# Altium PCB FogCalBoard.PcbDoc (part 2 of 2)
Units mil, origin at the board's own origin, x right, y up, seen from the top; angles counter-clockwise.
Board outline 2750 x 2750 mil, 4 copper layers (Top Layer, Middle 1 Layer, Middle 2 Layer, Bottom Layer), stack 53.912 mil thick; 111 components, 90 nets, 358 pads, 105 vias.
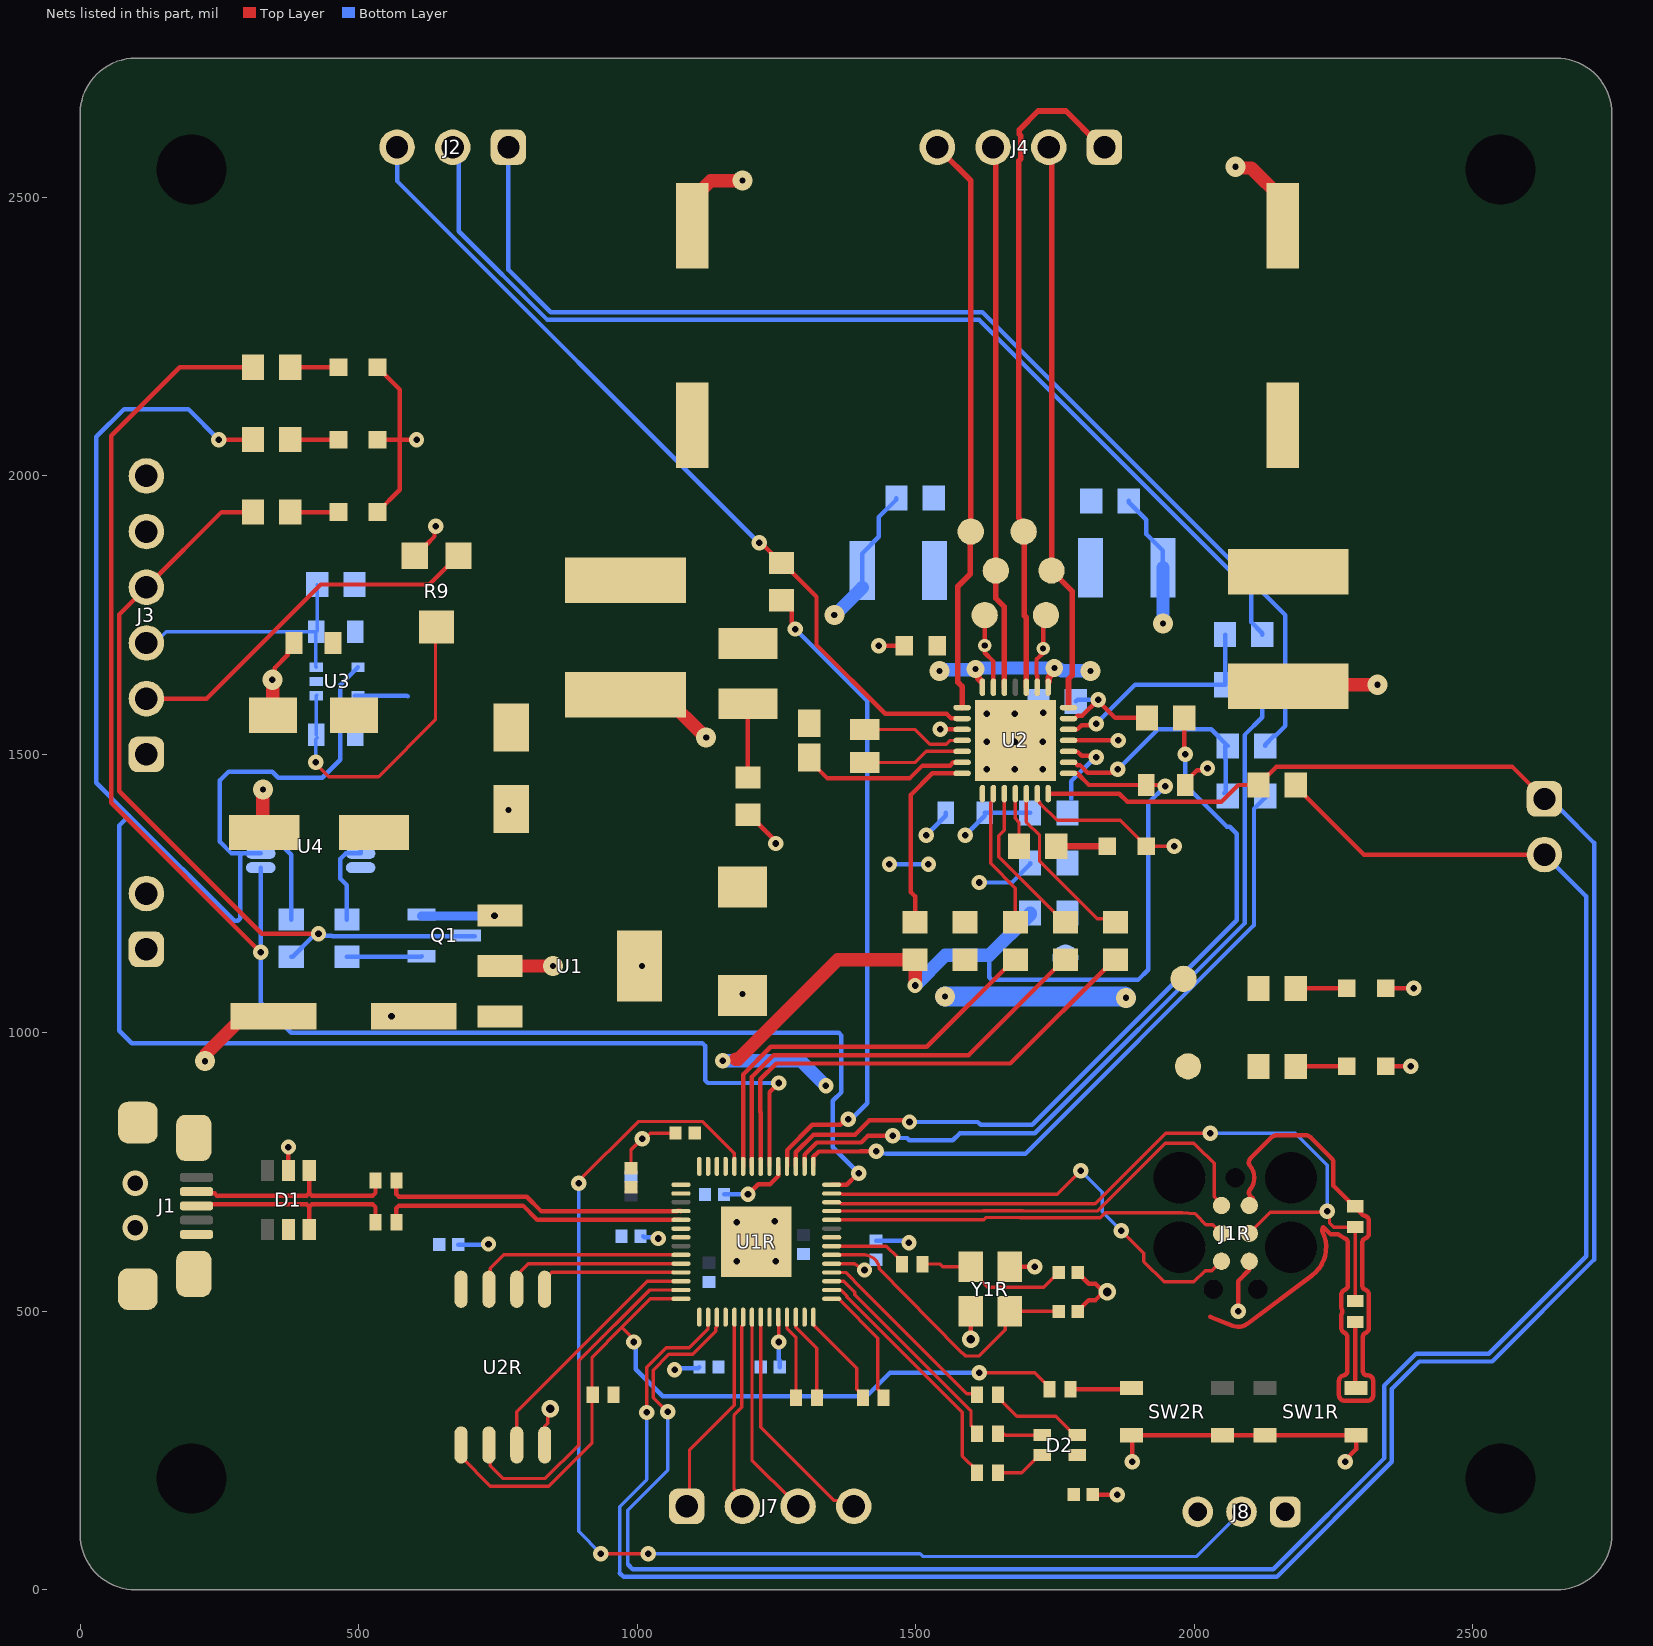
[diagram p4: the nets of this part, all layers, seen from the top]

## Via types
v1: diameter 27.56, hole 11.81, Top Layer to Bottom Layer, tented both sides, 79 vias
v2: diameter 36, hole 11, Top Layer to Bottom Layer, tented both sides, 17 vias
v3: diameter 31.5, hole 15.75, Top Layer to Bottom Layer, tented both sides, 3 vias
v4: diameter 32, hole 11, Top Layer to Bottom Layer, tented both sides, 2 vias
v5: diameter 45.28, hole 27.56, Top Layer to Bottom Layer, tented both sides, 2 vias
v6: diameter 24, hole 11, Top Layer to Bottom Layer, tented both sides, 2 vias

## Nets (pads, with @x,y where several pads share a name; then routed paths per layer and width w, separated by ;. In a path a pad name is that pad's centre, name@x,y a point inside that pad or via, vN(x,y) a via of type N, cw(c..) or ccw(c..) an arc to the next point about the centre after c; other vN are vias at no path point) (continued)
3V3: C1.1 C3R.1 C4R.1 C5.1 C5R.1 C6R.1 C7R.1 C8R.1 C9R.1 C10R.1 C14.1 D1.5 D2.4 J1R.2 J3.2 J8.1 R4R.1 R5R.1 R6.1 R9.1 R11.1 SB3.2 TP5.TP U1.3 U1R.1 U1R.10 U1R.22 U1R.33 U1R.42 U1R.43 U1R.44 U1R.48 U1R.49 U2.15 U2R.8 U3.5 U4.8 | length 4433.4
  Top Layer w6: v1(1254,445) U1R.10@1254,485
  Top Layer w8: J3.2@119,1600 227.02,1600 432.02,1805 627,1805 659.24,1837.24 659.75,1837.24 674.48,1851.98 R9.1@674.48,1852.48 ; v1(1199,710) 1217.41,728.41 1238.7,728.41 1253.37,743.09 U1R.33@1253.37,760.33 ; U2.15@1774.47,1465.94 1790.22,1465.94 1811.17,1445 C14.1@1914,1445 v1@1949,1445 ; 2029,490 2068.73,474.19 ccw(c2079,500) 2095.63,477.75 2211.72,564.54 ccw(c2174,615) 2230.7,642.47 cw(c2237.91,645.93) 2231.94,651.25 2244.89,638.3 2258.59,638.3 2260.5,637.13 2272.16,630.02 cw(c2268,623.19) 2276,623.19 2276,546.37 cw(c2268,546.41) 2270.81,538.92 ccw(c2274.24,529.53) 2264.24,529.53 2264.24,507.87 ccw(c2274.24,507.87) 2265.25,503.49 cw(c2258.05,500) 2265.25,496.51 ccw(c2274.24,492.13) 2264.24,492.13 2264.24,470.47 ccw(c2274.24,470.47) 2270.23,461.31 cw(c2267,453.99) 2275,454.03 2275,392.82 cw(c2267,392.86) 2268.38,384.98 ccw(c2270.02,375.12) 2260.02,375.12 2260.02,349.53 ccw(c2270.02,349.53) 2270.02,339.53 2311.36,339.53 ccw(c2311.36,349.53) 2321.36,349.53 2321.36,375.12 ccw(c2311.36,375.12) 2311.36,385.12 2311,385.12 cw(c2311,393.12) 2303,393.12 2303,454.03 cw(c2311,453.99) 2307.77,461.31 ccw(c2303.76,470.47) 2313.76,470.47 2313.76,529.53 ccw(c2303.76,529.53) 2307.19,538.92 cw(c2310,546.41) 2302,546.37 2302,623.63 cw(c2310,623.59) 2307.2,631.08 ccw(c2303.76,640.47) 2313.76,640.47 2313.76,662.13 ccw(c2303.76,662.13) 2303.76,672.13 2250,725.89 2250,766.1 ccw(c2237,766.1) 2246.23,775.25 2209.25,812.23 ccw(c2200.1,803) 2200.1,816 2147.9,816 ccw(c2147.9,803) 2138.71,812.19 2101.83,775.31 ccw(c2111,766.1) 2098.24,768.58 ccw(c2106.1,767.09) 2099.95,761.97 cw(c2074,740) 2100.22,718.36 ccw(c2106.42,713.3) 2099.07,710.16 ccw(c2111,715.32) 2101.79,706.14 2104.26,703.67 cw(c2098.63,697.99) 2105.76,694.37 J1R.2@2099,690
  Top Layer w24: 1176.5,952.5 1181.5,952.5 1360.5,1131.5 SB3.2@1499,1131.5 v1(1499,1085)
  Bottom Layer w8: J3.2@109,1590 J3.2@119,1590 ; J3.2@119,1595 J3.2@124,1600 ; U3.5@492.8,1605.41 586.59,1605.41 588,1604 ; C3R.1@679,620 v1@734,620 ; C5R.1@1011.13,634.96 1013.15,632.93 1036.1,632.93 v1(1038.16,630.87) ; v1(1067.22,395) 1069.72,397.5 1109.37,397.5 C6R.1@1111.87,400 ; C9R.1@1156.13,710 v1(1199,710) ; v1(1254,445) 1254,413.94 1256.13,411.81 C7R.1@1256.13,400 ; C8R.1@1429,627.13 1478.58,627.13 1482.71,623 v1(1488,623) ; 1632.09,1139.09 1632.09,1099.69 1636.78,1095 1899.2,1095 1917.66,1113.45 1917.66,1412.66 v1(1948,1443)
  Bottom Layer w24: v1(1154,950) 1294,950 v1(1339,905) ; v1(1499,1085) 1553.09,1139.09 1632.09,1139.09 1705.5,1212.5 R6.1@1705.5,1215
  other v1: 733.16,620.87 559,1030
+12: C2.2 C3.1 C4.2 C6.1 C7.1 C8.2 C9.1 C10.1 C11.1 CR1.1 CR2.1 J3.1 J5.1 Q1.2 R10.1 SB4.2 TP6.TP U1.1 U2.22 U2.28 | length 807.9
  Top Layer w12: v4(1607.63,1653.54) 1612.22,1648.95 1612.22,1636.86 U2.28@1618.87,1630.22 ; U2.22@1739.13,1630.22 1739.13,1638.64 1749,1648.51 v4(1749,1655)
  Top Layer w36: J5.1@119,1150 J5.1@132.89,1136.11
  Bottom Layer w16: Q1.2@613,1210 v1(744,1210)
  Bottom Layer w24: v2(1542.63,1650) 1544.4,1651.77 1605.86,1651.77 v4(1607.63,1653.54) ; v4@1609.32,1651.85 1612.47,1655 v4(1749,1655) 1751.3,1652.7 1759.14,1652.7 1761.84,1650 v2(1814,1650)
  Bottom Layer w36: v2(1552.61,1065.21) 1875.4,1065.21 v2(1877.61,1063)
DBG_TX_RP2040: J1R.5 U1R.27 | length 845.7
  Top Layer w6: U1R.27@1349.33,711.61 1366.56,711.61 1368.17,710 1754,710 1796.26,752.26 v1(1796.26,752.74) ; v1(1869,645) 1909.56,604.44 1909.56,589.44 1946,553 1999.68,553 2019.68,573 2032,573 J1R.5@2049,590
  Bottom Layer w6: v1(1796.26,752.74) 1835.04,713.96 1835.04,678.96 v1(1869,645)
EXT_DIR: J2.2 SB15.2 | length 1940.4
  Bottom Layer w8: J2.2@650.34,2588.66 655.25,2588.66 679.67,2564.23 679.67,2439.33 839,2280 1614.14,2280 2102.5,1791.64 2102.5,1737.5 2122.5,1717.5 SB15.2@2122.5,1715
EXT_STEP: J2.1 SB13.2 | length 2123.4
  Bottom Layer w8: J2.1@769,2590 769,2370 845,2294 1619.94,2294 2164,1749.94 2164,1551.5 2146,1533.5 2143.5,1533.5 2127.5,1517.5 SB13.2@2127.5,1515
GND: C1.2 C1R.2 C2.1 C2R.2 C3.2 C3R.2 C4R.2 C5.2 C5R.2 C6.2 C6R.2 C7.2 C7R.2 C8R.2 C9.2 C9R.2 C10.2 C10R.2 C11.2 C11R.2 C12R.2 C13.2 C13R.2 C14.2 C15.2 C16.2 CR1.2 CR2.2 CR3.2 D1.2 D3.2 D4.2 D5.2 D6.2 D7.2 D8.2 J1.5 J1.6 J1.7 J1.8 J1.9 J1R.6 J3.5 J3.6 J5.2 J8.3 R4.1 R8.1 R9.3 R16.2 R18.2 R19.2 R20.2 SB6.2 SB7.2 SW1R.B1 SW1R.B2 SW2R.B1 SW2R.B2 U1.2 U1.4 U1R.19 U1R.57 U2.3 U2.13 U2.18 U2.29 U2R.4 U3.2 U4.4 Y1R.2 Y1R.4 | length 4097.2
  Top Layer w6: U2R.4@834,260.24 834,293.7 839.5,299.2 839.5,320.5 v3(844,325) ; C4R.2@989,757.13 989,790 v1(1009,810) 1013.47,810 1023.47,820 C10R.2@1069,820 ; U1R.19@1349.33,585.63 1389.8,585.63 v1(1408.22,574.22) ; U2.13@1718.37,1429.53 1718.37,1418.7 1723.13,1413.94 1723.13,1412.52 1753.89,1381.76 1867.24,1381.76 D8.2@1914,1335 v1(1964,1335)
  Top Layer w8: C1.2@293.5,1030 C1.2@347,1030 ; v2@349.71,1636 349.71,1655.71 373,1679 373,1684 C2.1@394,1705 ; D1.2@374,753.15 v1(374,795) ; D7.2@534,1935 574,1975 574,2065 ; D6.2@534,2065 574,2065 ; D5.2@534,2195 574,2155 574,2065 ; v1(604,2065) 574,2065 ; R9.3@609,1864 609,1865.24 620.25,1876.49 621.49,1876.49 636.2,1891.2 636.2,1906.94 v1(638.56,1909.3) ; R4.1@1199,1391.5 1201.5,1391.5 1248,1345 v1@1249,1345 ; v1(1434,1695) C9.2@1479.47,1695 ; v1(1544,1545) 1544.16,1544.84 1583.37,1544.84 U2.3@1583.53,1544.68 ; v3(1599,450) Y1R.4@1599,500 ; Y1R.2@1669,580 v1(1714,580) ; U2.18@1774.47,1525 v1(1864,1525) ; C1R.2@1791.13,500 1791.13,500.79 1810.63,520.3 1822.94,520.3 v3@1837.64,535 ; C2R.2@1791.13,570 1791.13,569.21 1810.63,549.7 1822.94,549.7 v3@1837.64,535 ; C5.2@1818.13,171 1861,171 v1@1862,172 ; v3(1844,535) v3@1837.64,535 ; SW2R.B1@1887.31,277.68 1889,275.98 v1(1889,230) 1889,277.68 2116.68,277.68 ccw(c2116.68,280) SW1R.B1@2119,280 ; C14.2@1984,1445 1984,1450 2005.26,1471.26 2020.26,1471.26 v1(2024,1475) ; v1(2079,500) 2079,554.5 2099,574.5 J1R.6@2099,590 ; SW1R.B1@2127.31,277.68 SW1R.B2@2290.69,277.68 2290.69,252.64 2271.22,233.17 v1(2271.22,230) ; D4.2@2344,940 v1(2389,940) ; D3.2@2344,1080 v1(2394,1080)
  Top Layer w24: v2(224,949.17) 226.3,951.46 226.3,962.8 C1.2@293.5,1030 ; v2(328,1437) 328,1362.57 C3.2@330.57,1360 ; CR1.2@346,1570 v2@346,1627 ; U1.2@761.69,1120 v2(849,1120) ; C11.2@979,1607.24 1046.34,1607.24 1123.58,1530 v2(1124,1530) ; U1.4@1004,1120 v2(1009,1120) ; C7.2@1099,2449 1099,2496.5 1132.5,2530 v2(1189,2530) ; v2(2074,2555) 2076.3,2552.7 2102.8,2552.7 2159,2496.5 C6.2@2159,2449 ; C10.2@2169,1622.24 2171.76,1625 v2(2329,1625)
  Bottom Layer w8: v2(1354,1750) v2@1354.51,1750 ; R19.2@1404,1799.49 R19.2@1404,1830 1404,1860.51 1434,1890.51 1434,1926 1465.5,1957.5 SB7.2@1465.5,1960 ; v1(1519,1355) 1554,1390 C13.2@1554,1395 ; v1(1614,1270) 1673,1270 1705.5,1302.5 R8.1@1705.5,1305 ; SB6.2@1882.5,1955 1882.5,1952.5 1914,1921 1914,1895.51 1944,1865.51 R18.2@1944,1835
  Bottom Layer w24: v2@1354.51,1750 R19.2@1404,1799.49 ; v2@1944,1745 R18.2@1944,1835
  other v1: 1862,171 1179,590 1249,590 1179,660 1246.86,662.14 1249,1340 1628,1473 1678,1473 1728,1473 1628,1523 1678,1523 1728,1523 1628,1573 1678,1573 1729,1575
  other v2: 1189,1070 769,1400 345,1634 1944,1735
  other v5: 99,650 99,730
HEAT_OUT: J3.4 Q1.3 R14.1 SB2.1 | length 1440.1
  Top Layer w8: J3.4@119,1800 70.11,1751.11 70.11,1433.89 326,1178 v1(428,1178) ; J3.4@121.5,1802.5 254,1935 R14.1@310.5,1935
  Bottom Layer w8: SB2.1@379,1136.5 381.5,1136.5 419.11,1174.11 427.39,1174.11 428,1173.5 428.76,1174.26 451.6,1174.26 452.36,1173.5 Q1.3@708.54,1173.5
LEDB: R3.1 U1R.18 | length 352.4
  Top Layer w6: U1R.18@1349.33,569.88 1374.69,569.88 1404.56,540.01 1404.56,539.44 1592.16,351.84 1608.46,351.84 R3.1@1610.3,350
LEDG: R2.1 U1R.17 | length 394.7
  Top Layer w6: U1R.17@1349.33,554.13 1349.4,554.07 1370.7,554.07 1390.56,534.21 1390.56,530.01 1599.47,321.09 1599.47,294.76 1610.3,283.94 R2.1@1610.3,280
LEDR: R1.1 U1R.16 | length 446.6
  Top Layer w6: U1R.16@1349.33,538.39 1349.4,538.32 1366.65,538.32 1376.56,528.41 1376.56,526.31 1584,318.87 1584,240.24 1610.3,213.94 R1.1@1610.3,210
MC5V: C13.1 CR3.1 R7.1 SB4.1 U2.8 | length 206.2
  Bottom Layer w6: C13.1@1624,1390 C13.1@1624,1395
  Bottom Layer w8: v1@1454,1300 1457,1303 v1(1523,1303) ; v1(1589,1355) C13.1@1624,1390 ; C13.1@1624,1395 R7.1@1705.5,1395
  other v1: 1453,1303
MC_DIAG: R15.1 U2.11 | length 97.2
  Top Layer w6: U2.11@1679,1429.53 1679,1385 1685.5,1378.5 R15.1@1685.5,1335
MC_ENN: J2.3 SB1.2 U2.2 | length 1521.5
  Top Layer w8: v1@1224,1878.5 1240.5,1862 1240.5,1859.5 1256.5,1843.5 1261.5,1843.5 1322,1783 1322,1696.37 1445.59,1572.78 1555.51,1572.78 1563.56,1564.72 1583.18,1564.72 U2.2@1583.53,1564.37
  Bottom Layer w8: J2.3@569,2590 569,2529.36 1218.36,1880 v1(1219,1880)
MC_IDX: SB11.2 U1R.35 | length 870.1
  Top Layer w8: U1R.35@1221.87,773.56 1221.87,857.06 1221.22,857.71 1221.22,916.51 1249.71,945 1670,945 1856.5,1131.5 SB11.2@1859,1131.5
MC_MS1: SB9.2 U1R.37 | length 739
  Top Layer w8: U1R.37@1190.38,760.33 1190.38,773.5 1190.44,773.56 1190.44,925.33 1240.12,975 1520,975 1676.5,1131.5 SB9.2@1679,1131.5
MC_MS2: SB10.2 U1R.36 | length 810.9
  Top Layer w8: U1R.36@1206.13,760.33 1206.13,921.21 1244.91,960 1595,960 1766.5,1131.5 SB10.2@1769,1131.5
MC_STDBY: SB5.1 U1R.31 | length 1400.5
  Top Layer w8: U1R.31@1284.87,760.33 1284.87,785.46 1316.62,817.22 1391.22,817.22 1416.78,842.78 1486.22,842.78 v1(1489,840) ; SB5.1@1982.5,1565 1982.5,1501.5 v1(1984,1500)
  Bottom Layer w8: v1(1489,840) 1611.75,840 1616.75,835 1709.2,835 2076.5,1202.3 2076.5,1357.5 2064,1370 2058.86,1370 1984,1444.86 v1(1984,1500)
MC_VREF: R6.2 R7.2 R8.2 TP7.TP U2.17 | length 148.4
  Top Layer w8: U2.17@1774.47,1505.31 1774.82,1504.96 1790.57,1504.96 1798.22,1497.32 1821.68,1497.32 v1(1824,1495)
  Bottom Layer w8: 1779,1420 1779,1451.72 1822.28,1495 v1(1824,1495)
NetC2R_1: C2R.1 R1R.2 Y1R.3 | length 276.3
  Top Layer w6: R1R.2@1512.7,585 1544,585 1549,580 Y1R.3@1599,580 1599,574.09 1629.65,543.44 1730.31,543.44 1748.06,561.19 1748.85,561.19 1756.87,569.21 C2R.1@1756.87,570
NetC4_1: C4.1 U2.6 | length 304.9
  Top Layer w8: C4.1@1309,1494.41 1309,1489.57 1341.8,1456.77 1489.16,1456.77 1512.33,1479.94 1562.09,1479.94 1567.78,1485.63 U2.6@1583.53,1485.63
NetC8_1: C8.1 R4.2 | length 132.4
  Top Layer w8: R4.2@1199,1458.5 C8.1@1199,1590.87
NetC12_1: C12.1 U2.5 | length 186.7
  Top Layer w6: C12.1@1409,1495 1418.53,1485.47 1499.47,1485.47 1519.31,1505.31 U2.5@1583.53,1505.31
NetC12_2: C12.2 U2.4 | length 178.2
  Top Layer w6: C12.2@1419,1544.53 1499.47,1544.53 1525.78,1518.22 1555.09,1518.22 1561.87,1525 U2.4@1583.53,1525
NetC16_1: C16.1 R9.2 U3.1 | length 550.5
  Top Layer w6: v1(423,1486) 423,1483 446.22,1459.78 535.78,1459.78 638,1562 R9.2@638,1725.91
  Bottom Layer w6: v1(423,1486) 423,1527 C16.1@426,1530 ; C16.1@424,1535 424,1605 U3.1@425,1606
NetD2_1: D2.1 R1.2 | length 93.2
  Top Layer w6: R1.2@1647.7,210 1690.3,210 1722.58,242.28 D2.1@1727.5,242.28
NetD2_2: D2.2 R2.2 | length 80.7
  Top Layer w6: R2.2@1647.7,280 1658.53,280 1660.81,277.72 D2.2@1727.5,277.72
NetD2_3: D2.3 R3.2 | length 175
  Top Layer w6: R3.2@1647.7,350 1647.7,346.06 1681.87,311.89 1751.4,311.89 1785.57,277.72 D2.3@1790.5,277.72
NetD3_1: D3.1 R10.2 | length 91.5
  Top Layer w8: R10.2@2182.5,1080 D3.1@2274,1080
NetD4_1: D4.1 R11.2 | length 91.5
  Top Layer w8: R11.2@2182.5,940 D4.1@2274,940
NetD5_1: D5.1 R12.2 | length 86.5
  Top Layer w8: R12.2@377.5,2195 D5.1@464,2195
NetD6_1: D6.1 R13.2 | length 86.5
  Top Layer w8: R13.2@377.5,2065 D6.1@464,2065
NetD7_1: D7.1 R14.2 | length 88.6
  Top Layer w8: R14.2@377.5,1940 382.5,1935 D7.1@464,1935
NetD8_1: D8.1 R15.2 | length 91.5
  Top Layer w12: R15.2@1752.5,1335 D8.1@1844,1335
NetDNP1_1: DNP1.1 U1R.11 | length 151.4
  Top Layer w6: U1R.11@1269.12,489.67 1269.12,469.17 1285.3,452.99 DNP1.1@1285.3,345
NetDNP1_2: DNP1.2 U1R.12 | length 160.3
  Top Layer w6: U1R.12@1284.87,489.67 1284.87,471.8 1322.7,433.97 DNP1.2@1322.7,345
NetDNP2_1: DNP2.1 U1R.14 | length 181.5
  Top Layer w6: U1R.14@1316.36,489.67 1316.36,476.38 1394.47,398.27 1394.47,359.76 1405.3,348.94 DNP2.1@1405.3,345
NetDNP2_2: DNP2.2 U1R.15 | length 207
  Top Layer w6: U1R.15@1364.43,519.57 1431.87,452.13 1431.87,359.76 1442.7,348.94 DNP2.2@1442.7,345
NetJ8_2: J8.2 U1R.38 | length 2242.4
  Top Layer w6: v1@891.93,730.8 1001.94,840.81 1118,840.81 1174.63,784.18 U1R.38@1174.63,760.33 ; v1(935,65) v1(1020,65)
  Bottom Layer w6: v1(895.09,730.04) 895.09,104.91 v1(935,65) ; v1(1020,65) 1507.92,65 1512.92,60 2005,60 J8.2@2085,140
NetQ1_1: Q1.1 SB8.2 | length 134.4
  Bottom Layer w8: SB8.2@479,1136.5 612,1136.5 Q1.1@613,1137.5
NetR6R_1: R6R.1 SW1R.A2 | length 121.3
  Top Layer w8: SW1R.A2@2289,360 R6R.1@2289,481.3
NetR7R_1: R7R.1 SW2R.A1 | length 111.3
  Top Layer w8: R7R.1@1777.7,360 SW2R.A1@1889,360
NetR18_1: R18.1 SB6.1 TP9.TP U2.23 | length 129.6
  Top Layer w8: U2.23@1718.37,1620.47 1718.02,1620.82 1718.02,1640.73 1717,1641.75 1717,1670.42 v6@1729,1682.42 ; v6(1729,1690) 1729,1745 TP9.TP@1734,1750
NetR19_1: R19.1 SB7.1 TP8.TP U2.27 | length 131
  Top Layer w8: TP8.TP@1624,1745 1624,1682.42 1639.63,1666.79 U2.27@1639.63,1620.47
  other v6: 1624,1695.44
NetR20_1: R20.1 SB5.2 U2.20 | length 200.2
  Top Layer w8: U2.20@1774.47,1564.37 1785.8,1564.37 1790.56,1569.13 1798.85,1569.13 v1(1827.86,1598.14) 1827.86,1595.85 1858.06,1565.64 1903.36,1565.64 SB5.2@1904,1565
  Bottom Layer w8: R20.1@1787.5,1595 1790.64,1598.14 v1(1827.86,1598.14)
NetSB2_2: SB2.2 U4.3 | length 182.5
  Bottom Layer w8: U4.3@324.43,1347.8 351.01,1347.8 379,1319.8 SB2.2@379,1203.5
NetSB3_1: SB3.1 U2.7 | length 340.3
  Top Layer w8: SB3.1@1499,1198.5 1499,1245 1491.22,1252.78 1491.22,1427.22 1529.94,1465.94 U2.7@1583.53,1465.94
NetSB8_1: SB8.1 U4.5 U4.6 U4.7 | length 205.6
  Bottom Layer w8: SB8.1@479,1203.5 479,1265 466.99,1277.01 466.99,1312.2 476.99,1322.2 U4.7@503.57,1322.2 U4.6@503.57,1347.8 U4.5@503.57,1373.39
NetSB9_1: SB9.1 U2.9 | length 251.3
  Top Layer w6: U2.9@1639.63,1429.53 1639.63,1418.2 1634.87,1413.44 1634.87,1304.13 1679,1260 SB9.1@1679,1198.5
NetSB10_1: SB10.1 U2.10 | length 286.5
  Top Layer w6: U2.10@1659.32,1429.53 1659.32,1364.04 1649,1353.73 1649,1316 1766.5,1198.5 SB10.1@1769,1198.5
NetSB11_1: SB11.1 U2.12 | length 313
  Top Layer w6: U2.12@1698.69,1429.53 1698.69,1378.46 1722.5,1354.64 1722.5,1308.36 1826.04,1204.81 1852.69,1204.81 SB11.1@1859,1198.5
NetSB12_1: SB12.1 SB13.1 U2.16 | length 426.8
  Top Layer w8: U2.16@1774.47,1485.63 1785.8,1485.63 1790.56,1480.87 1795.1,1480.87 1808.74,1467.22 1851.93,1467.22 1859.71,1475 v1@1864,1475
  Bottom Layer w8: v1(1863,1473) 1935,1545 2030.5,1545 2058,1517.5 SB13.1@2060.5,1515 ; SB12.1@2054,1430 2056.78,1432.78 2056.78,1491.22 2055.5,1492.5 SB13.1@2055.5,1515
NetSB14_1: SB14.1 SB15.1 U2.19 | length 404.3
  Top Layer w8: U2.19@1774.47,1544.68 1774.82,1545.04 1790.57,1545.04 1798.22,1552.68 1821.68,1552.68 v1(1824,1555)
  Bottom Layer w8: v1(1824,1555) 1894,1625 SB14.1@2055.5,1625 SB15.1@2055.5,1715
NetU1R_4: U1R.4
NetU1R_9: U1R.9
NetU1R_13: U1R.13
NetU1R_39: U1R.39
NetU1R_40: U1R.40
NetU1R_41: U1R.41
OA1: J4.1 TP4.TP U2.24 | length 1188.4
  Top Layer w10: TP4.TP@1694,1900 1686.87,1907.13 1686.87,1922.61 1685,1924.48 1685,2565.45 1688.89,2569.34 1688.89,2610.66 1686.42,2613.14 1686.42,2621.42 1720,2655 1769.66,2655 J4.1@1827.94,2596.72 ; TP4.TP@1695.11,1900 1695.11,1748.89 1698.69,1745.32 U2.24@1698.69,1620.47
OA2: J4.2 TP3.TP U2.21 | length 1014.6
  Top Layer w10: J4.2@1744,2580.65 TP3.TP@1744,1830 1781,1793 1781,1641.75 1774.47,1635.22 U2.21@1774.47,1584.06
OB1: J4.3 TP2.TP U2.26 | length 962.4
  Top Layer w10: J4.3@1644,2576.49 TP2.TP@1644,1830 1644,1780 1659.32,1764.68 U2.26@1659.32,1620.47
OB2: J4.4 TP1.TP U2.1 | length 1034.6
  Top Layer w10: J4.4@1545.48,2583.52 1599,2530 TP1.TP@1599,1900 1598.06,1899.06 1598.06,1824.06 1575.63,1801.63 1575.63,1629.8 1583.53,1621.9 U2.1@1583.53,1584.06
QSPI_SCLK_RP2040: U1R.52 U2R.6 | length 328.4
  Top Layer w6: U2R.6@784,539.76 784,565 804.63,585.63 U1R.52@1078.67,585.63
QSPI_SD0_RP2040: U1R.53 U2R.5 | length 254.3
  Top Layer w6: U2R.5@834,539.76 834,557.45 846.5,569.94 U1R.53@1065.44,569.94
QSPI_SD1_RP2040: U1R.55 U2R.2 | length 619
  Top Layer w6: U2R.2@734,260.24 736.05,258.19 736.05,222.95 759,200 835.24,200 895,259.76 895,411 1022.39,538.39 U1R.55@1078.67,538.39
QSPI_SD2_RP2040: U1R.54 U2R.3 | length 451.4
  Top Layer w6: U2R.3@784,260.24 784,320 1018.13,554.13 U1R.54@1078.67,554.13
QSPI_SD3_RP2040: U1R.51 U2R.7 | length 390.8
  Top Layer w6: U2R.7@734,539.76 736.05,541.81 736.05,577.05 760.38,601.38 U1R.51@1078.67,601.38
QSPI_SS_RP2040: R5R.2 R7R.2 U1R.56 U2R.1 | length 1538.5
  Top Layer w6: U2R.1@684,260.24 684,238.58 736.58,186 841.04,186 919,263.96 919,418.03 972.49,471.51 ; v1@994,450 972.49,471.51 ; U1R.56@1078.67,522.64 1023.61,522.64 972.49,471.51 ; v1(1614,390) 1714.24,390 1740.3,363.94 R7R.2@1740.3,360
  Bottom Layer w8: v1@993.71,440 997.74,435.96 997.74,396.26 1046.18,347.82 1411.82,347.82 1454,390 v1(1614,390)
  other v1: 994,445
RP_DIR: SB14.2 U1R.30 | length 1426.1
  Top Layer w8: U1R.30@1300.61,760.33 1300.68,760.4 1300.68,781.48 1322.42,803.22 1402.22,803.22 1414,815 v1@1454,815
  Bottom Layer w8: v1(1459,815) 1462.74,811.26 1484.74,811.26 1488.78,807.22 1566.72,807.22 1579.5,820 1714,820 2090.5,1196.5 2090.5,1534.64 2122.5,1566.64 SB14.2@2122.5,1625
RP_ENN: SB1.1 U1R.32 | length 1176
  Top Layer w8: SB1.1@1259,1776.5 1261.5,1776.5 1277.5,1760.5 1277.5,1736.79 1284,1730.29 v1(1284,1725) ; U1R.32@1269.12,760.33 1269.12,789.51 1314.6,835 1364.53,835 1374.53,845 v1(1379,845)
  Bottom Layer w8: v1(1284,1725) 1413,1596 1413,873.71 1384.29,845 v1(1379,845)
RP_HEAT: R12.1 U1R.28 U4.1 | length 2983.1
  Top Layer w8: R12.1@310.5,2195 179,2195 56.11,2072.11 56.11,1412.89 v1(324,1145) ; U1R.28@1349.33,727.36 1376.61,727.36 1394,744.75 v1@1394,750
  Bottom Layer w8: U4.1@324.43,1296.61 324,1296.18 324,1055 379,1000 1362.09,1000 1366.78,995.31 1366.78,893.49 1351.22,877.93 1351.22,794.78 1396,750 v1@1399,750
  other v1: 1398,748
RP_STEP: SB12.2 U1R.29 | length 1223.7
  Top Layer w8: U1R.29@1316.36,760.33 1316.36,777.36 1326,787 1400.6,787 1400.82,787.22 v1(1429,787.22)
  Bottom Layer w8: v1(1429,787.22) 1432.74,783.48 1447.2,783.48 1447.49,783.18 1697.18,783.18 2107.5,1193.5 2107.5,1402.5 2127.5,1422.5 SB12.2@2127.5,1425
RUN_RP2040: J1R.4 R4R.2 R6R.2 U1R.26 | length 1412
  Top Layer w6: U1R.26@1349.33,695.87 1363.13,695.87 1365.94,693.06 1822.06,693.06 1949,820 v1@2029.85,820 ; J1R.4@2099,640 2136.72,677.72 2236.72,677.72 v1(2239,680) 2243.13,675.87 2243.13,658.44 2250.27,651.3 R4R.2@2289,651.3 R6R.2@2289,518.7
  Bottom Layer w6: v1(2029,820) 2181.68,820 2239,762.68 v1(2239,680)
SPI_CSN: J7.3 U1R.7 | length 369.9
  Top Layer w6: U1R.7@1206.13,489.67 1206.13,232.87 1279,160 J7.3@1289,160
SPI_RX: J7.2 U1R.6 | length 352.7
  Top Layer w6: J7.2@1189,150 1189,165.63 1173.97,180.67 1173.97,314 1187.57,327.6 1187.57,473.06 1190.38,475.87 U1R.6@1190.38,489.67
SPI_SCK: J7.4 U1R.8 | length 423.5
  Top Layer w6: U1R.8@1221.87,489.67 1221.87,292.13 1353.59,160.41 1378.59,160.41 J7.4@1389,150
SPI_TX: J7.1 U1R.5 | length 363.1
  Top Layer w6: J7.1@1094,160 1094,251 1174.27,331.27 1174.27,489.31 U1R.5@1174.63,489.67
SWCLK_RP2040: J1R.3 U1R.24 | length 719.9
  Top Layer w6: U1R.24@1349.33,664.37 1622.46,664.37 1626.65,668.56 1687.35,668.56 1687.79,668.12 1831.41,668.12 1840.29,677 1974,677 1978.8,677 1979.01,676.8 2001.66,675 ; 2001.68,675 2003.44,673.24 2021.18,655.5 2033.5,655.5 J1R.3@2049,640
SWDIO_RP2040: J1R.1 U1R.25 | length 833.6
  Top Layer w6: U1R.25@1349.33,680.12 1621.24,680.12 1621.68,680.56 1692.32,680.56 1692.76,680.12 1826.44,680.12 1942.13,795.81 1948.32,802 1999.68,802 2005.87,795.81 2036,765.68 2036,706.01 2049,693.01 J1R.1@2049,690
THERM_OK: R13.1 U1R.34 U3.4 U4.2 | length 3844.8
  Top Layer w8: v1(249,2065) R13.1@310.5,2065 ; U1R.34@1237.62,760.33 1237.62,893.62 v1(1254,910)
  Bottom Layer w8: v1(249,2065) 194,2120 79,2120 29,2070 29,1448.86 87.83,1390.03 ; 287.86,1322.2 271.8,1322.2 251,1343 251,1453.53 266.47,1469 345.1,1469 355.88,1458.22 434.51,1458.22 466.84,1490.55 466.84,1624.63 U3.4@498.8,1656.59 ; U4.2@324.43,1322.2 291.2,1322.2 287.86,1318.86 287.86,1206 283.17,1201.31 276.54,1201.31 87.83,1390.03 ; v1(1254,910) 1126.66,910 1121.98,914.69 1121.98,976.48 1117.29,981.17 92.52,981.17 70.11,1003.58 70.11,1372.3 87.83,1390.03
THERMISTOR-: C15.1 J3.3 R16.1 U3.3 | length 453
  Bottom Layer w6: J3.3@125,1709 143.63,1709 154.63,1720 C15.1@424,1720 425.5,1721.5 R16.1@425.5,1805 ; C15.1@423,1720 423,1657.59 U3.3@424,1656.59
UART_RX: J6.1 R5.1 U1R.2 U2.14 | length 4430.6
  Top Layer w6: v1(1017.56,318.56) 1017,319.13 1017,399.62 1052.38,435 1094,435 1127.39,468.39 U1R.2@1127.39,489.67
  Top Layer w8: U2.14@1738.06,1429.53 1865.8,1429.53 1880.32,1415 2049,1415 2079,1445 R5.1@2115.5,1445 2115.5,1447.5 2131.5,1463.5 2133.44,1463.5 2147.44,1477.5 2571.5,1477.5 J6.1@2629,1420
  Bottom Layer w6: 969,30 969,149.58 1017.56,198.15 v1(1017.56,318.56)
  Bottom Layer w8: 969,30 975.78,23.22 2148.22,23.22 2355,230 2355,230.2 2355,360.73 2404.26,410 2445.86,410 2534.8,410 2535,410 2718,593 2718,1341 2659.52,1399.48 2655.98,1399.48 J6.1@2632.15,1423.31
UART_TX: J6.2 R5.2 U1R.3 | length 3860.6
  Top Layer w6: v1(1055.09,320.04) 1053.96,320.04 1029,345 1029,394.65 1057.13,422.78 1100.16,422.78 1141.32,463.94 1141.32,470.63 1143.13,472.44 U1R.3@1143.13,489.67
  Top Layer w8: R5.2@2182.5,1445 2182.5,1442.5 2305,1320 J6.2@2629,1320
  Bottom Layer w6: 984,45 983.22,45.78 983.22,143.28 1055.09,215.15 v1(1055.09,320.04)
  Bottom Layer w8: 984,45 991.78,37.22 2142.22,37.22 2341,236 2341,366.53 2398.47,424 2529,424 2704,599 2704,1245 J6.2@2616.5,1332.5
USB_N: D1.1 J1.2 R3R.1 | length 398
  Top Layer w8: J1.2@209,715.59 212.87,711.72 241.31,711.72 245.02,708 406.72,708 411.4,712.69 ; D1.1@411.4,753.15 411.4,712.69 ; R3R.1@530.3,740 530.3,712.69 525.61,708 416.09,708 411.4,712.69
USB_P: D1.6 J1.3 R2R.1 | length 385.7
  Top Layer w8: J1.3@209,690 211,692 406.72,692 411.4,687.31 ; D1.6@411.4,646.85 411.4,687.31 ; R2R.1@530.3,670 530.3,687.31 525.61,692 416.09,692 411.4,687.31
USB_RP2040_N: R3R.2 U1R.46 | length 553.3
  Top Layer w8: R3R.2@567.7,740 567.7,710.69 572.39,706 801.6,706 827.49,680.12 1071.79,680.12 1072.04,680.37 1078.67,680.37 U1R.46@1078.67,680.12
USB_RP2040_P: R2R.2 U1R.47 | length 538.7
  Top Layer w8: R2R.2@567.7,670 567.7,685.31 572.39,690 794.98,690 820.86,664.12 U1R.47@1078.41,664.12
XIN_RP2040: C1R.1 U1R.20 Y1R.1 | length 533.7
  Top Layer w6: U1R.20@1349.33,601.38 1408.38,601.38 1412.83,600.6 cw(c1408.22,574.22) 1434.87,576.81 1578.44,429.91 ccw(c1599,450) 1580.21,428.24 1589.76,420 1592.24,420 1614,420 1660.96,466.96 1660.96,491.96 Y1R.1@1669,500 C1R.1@1756.87,500
XOUT_RP2040: R1R.1 U1R.21 | length 141.6
  Top Layer w6: U1R.21@1349.33,617.13 1447.11,617.13 1467.47,596.76 1475.3,588.94 R1R.1@1475.3,585
pads on no net: D1.3 D1.4 J1.1 J1.4 J1R.A J1R.B J1R.C J1R.D J1R.E J1R.F J1R.G SW1R.A1 SW2R.A2 U2.25

## Polygon pours and split planes (outlines as drawn)
GND on Middle 1 Layer "GND_L02_P000" (solid, pour order 0): -150,4180 ccw(c-140,4180) -140,4170 4170,4170 ccw(c4170,4110) 4110,4110 4110,-240 ccw(c4080,-240) 4080,-210 -140,-210
GND on Middle 2 Layer "GND_L03_P001" (solid, pour order 1): -202.44,4143.5 ccw(c-192.44,4143.5) -192.44,4133.5 4117.56,4133.5 ccw(c4117.56,4073.5) 4057.56,4073.5 4057.56,-276.5 ccw(c4027.56,-276.5) 4027.56,-246.5 -192.44,-246.5
+12 on Top Layer "+12_L01_P008" (solid, pour order 8): 39,2279 490,2730 2290,2730 2734,2286 2734,1100 2689,1055 104,1055 39,1120
3V3 on Top Layer "3V3_L01_P005" (solid, pour order 5): 508,1044 528,1064 795,1064 879,980 2384,980 2479,885 2479,145 2354,20 469,20 309,180 309,662.36 508,861.36
MC5V on Top Layer "MC5V_L01_P003" (solid, pour order 3): 1159,1465 1109,1415 1109,1205 1159,1155 1249,1155 1631.2,1147.2 1689,1205 1689,1405 1629,1465
GND on Top Layer "GND_L01_P007" (solid, pour order 7): 10.79,897.24 210.79,897.24 260.79,847.24 260.79,537.24 210.79,487.24 10.79,487.24
3V3 on Bottom Layer "3V3_L04_P014" (solid, pour order 14): 841.01,2090.11 876.86,2054.26 883.31,1022.41 841.01,980.11 541.01,980.11 51.01,1470.11 51.01,2050.11 91.01,2090.11
GND on Bottom Layer "GND_L04_P004" (solid, pour order 4): 2729,570 2189,30 8.89,30 19.05,965 40.05,986 2673,986 2729,930
GND on Bottom Layer "GND_L04_P013" (solid, pour order 13): 549,1825 534,1840 289,1840 274,1825 274,1360 289,1345 534,1345 549,1360
MC_VREF on Bottom Layer "MC_VREF_L04_P012" (solid, pour order 12): 1810.05,1440 1825.85,1424.01 1825.85,1114.36 1805.85,1094.36 1750.85,1094.36 1730.85,1114.36 1730.85,1421.98 1749.05,1440
NetR19_1 on Bottom Layer "NetR18_1" (solid, pour order 11): 1509,2010 1489,1990 1489,1780 1599,1670 1649,1670 1659,1680 1659,1695 1614,1740 1614,1990 1594,2010
NetR18_1 on Bottom Layer "NetR18_1" (solid, pour order 9): 1849,2010 1869,1990 1869,1780 1759,1670 1709,1670 1699,1680 1699,1695 1744,1740 1744,1990 1764,2010

## Keep-outs
Keep-Out Layer:
  region: 2450,2350 cw(c2450,2450) 2350,2450 2350,2750 2660,2750 cw(c2660,2660) 2750,2660 2750,2350
  region: 400,2450 cw(c300,2450) 300,2350 0,2350 0,2660 cw(c90,2660) 90,2750 400,2750
  region: 2365,352.68 cw(c2450,300) 2450,400 2750,400 2750,90 cw(c2660,90) 2660,0 2365,0
  region: 300,400 cw(c300,300) 400,300 400,0 90,0 cw(c90,90) 0,90 0,400

## Other copper
Top Layer:
  pour cut-out: 1099,740 1329,740 1329,510 1099,510

## Silkscreen, mask and mechanical layers (free items; w line width, h text height)
Top Overlay:
  circle w10: c1660,2130 r22.36
  lines w5: 165,985 50,985 50,1045 ; 605,2360 605,2420 ; 665,80 665,140 ; 725,2360 725,2420 ; 760,80 760,140 ; 870,80 870,135 ; 1545,2100 1605,2100 ; 1545,2160 1605,2160 ; 1590,2370 1590,2430 ; 1630,2185 1630,2245 ; 1690,2185 1690,2245 ; 1690,2370 1690,2430 ; 1790,2370 1790,2430 ; 2385,1360 2445,1360 ; 50,1045 165,1045 165,925 50,925 50,1045 ; 460,2360 460,2420 870,2420 870,2360 460,2360 ; 575,80 980,80 980,140 575,140 575,80 ; 1495,2370 1495,2430 1880,2430 1880,2370 1495,2370 ; 2385,1270 2385,1460 2445,1460 2445,1270 2385,1270
  lines w6: 1605,2100 ccw(c1605,2110) 1605,2120 ccw(c1605,2130) 1605,2140 ccw(c1605,2150) 1605,2160 ; 1630,2185 ccw(c1640,2185) 1650,2185 ccw(c1660,2185) 1670,2185 ccw(c1680,2185) 1690,2185
  text "B2" at 1565,2415 h30 r180
  text "B1" at 1655,2415 h30 r180
  text "A2" at 1760,2415 h30 r180
  text "A1" at 1855,2415 h30 r180
  text "ENAB" at 590,2405 h30 r180
  text "DIR" at 700,2405 h30 r180
  text "STEP" at 850,2405 h30 r180
  text "MOTOR" at 1880,2360 h30 r180
  text "CTRL" at 865,2350 h30 r180
  text "B1" at 1640,2290 h30 r180
  text "B2" at 1725,2290 h30 r180
  text "A2" at 1535,2170 h30 r180
  text "A1" at 1535,2110 h30 r180
  text "CAL RIG INTEFCE" at 260,1855 h30 r270
  text "RX" at 2430,1390 h30 r90
  text "TX" at 2430,1290 h30 r90
  text "UART" at 2370,1275 h30 r90
  text "PWR" at 175,1040 h30 r270
  text "GND" at 65,1000 h30
  text "12V" at 70,940 h30
  text "SPI" at 585,150 h30
  text "TX" at 595,95 h30
  text "RX" at 690,95 h30
  text "CSN" at 775,95 h30
  text "SCK" at 885,95 h30
Bottom Overlay:
  drawing of 28 lines, arcs and shapes, not listed
  text "GND" at 210,1915 h30 r270
  text "HT" at 210,1785 h30 r270
  text "OSU UWRT" at 2450,1705 h40 r90
  text "'.ProjectTitle'" at 2529,1705 h40 r90
  text "V1.0" at 2605,1705 h40 r90
  text "TH-" at 210,1665 h30 r270
  text "TH+" at 210,1560 h30 r270
  text "12V" at 210,1455 h30 r270